# Altium PCB TFT50V30机械图.PcbDoc
Units mil, origin at the board's own origin, x right, y up, seen from the top; angles counter-clockwise.
Board outline 5177.46 x 2992.26 mil, 2 copper layers (Top Layer, Bottom Layer); 2 components, 86 nets, 82 pads, 13 vias.
Unrouted connection lines stored in the file: 53.
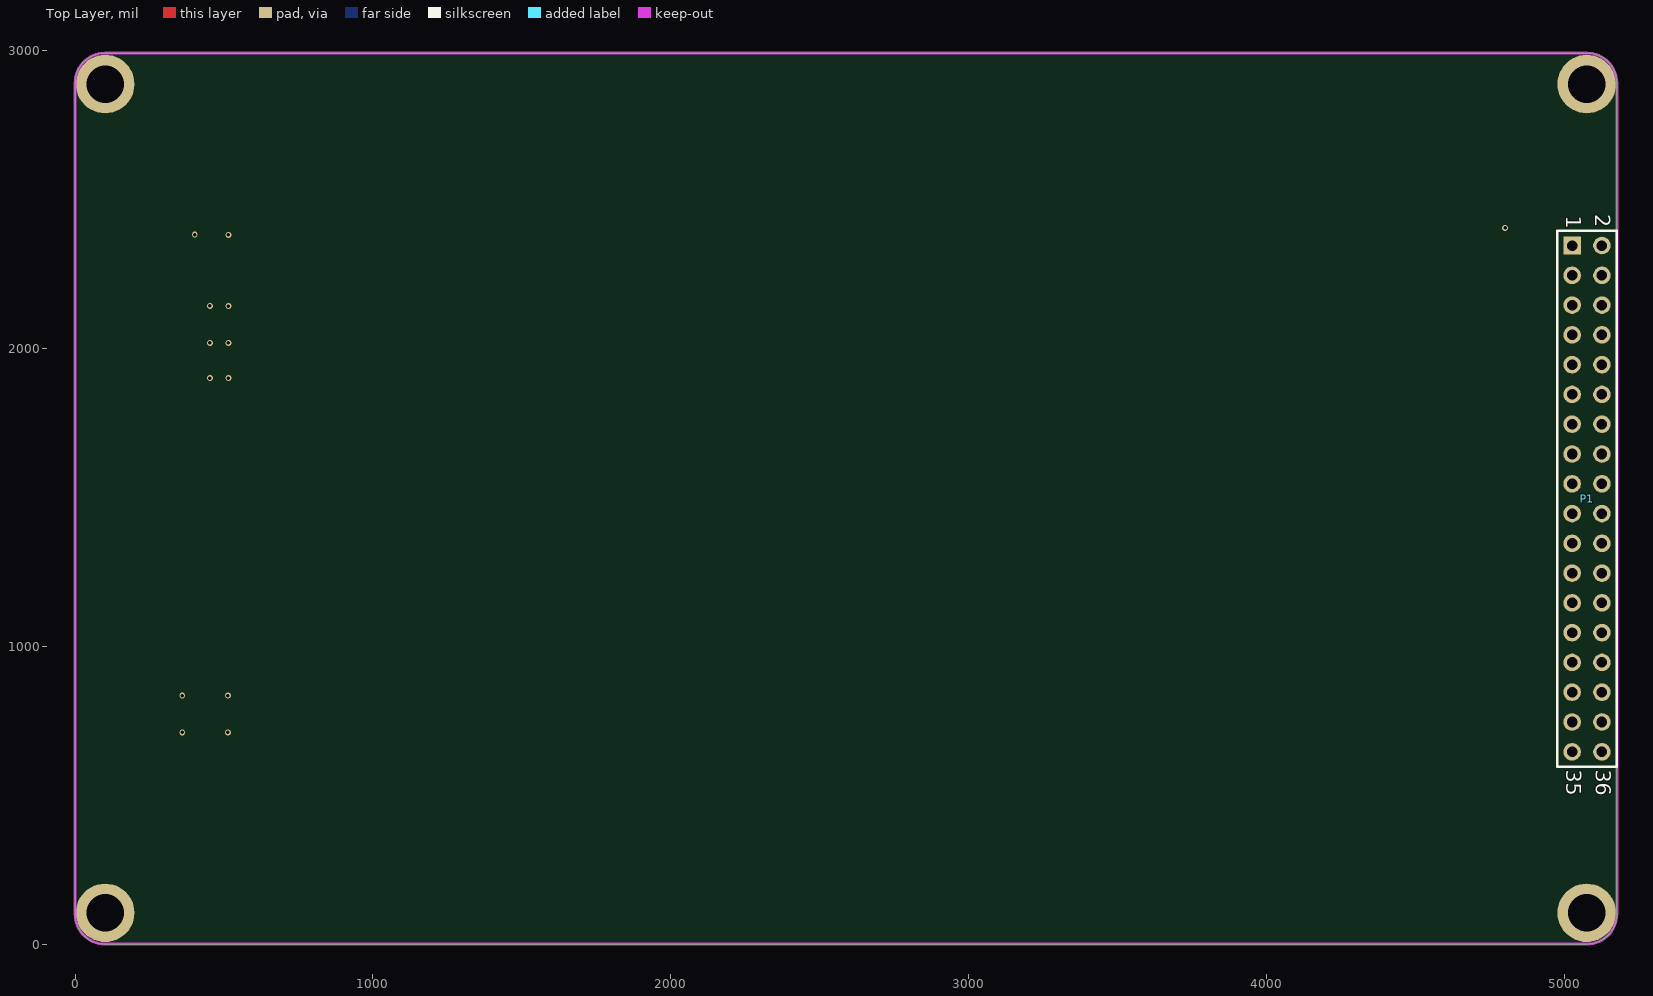
[diagram p0: Top Layer view]
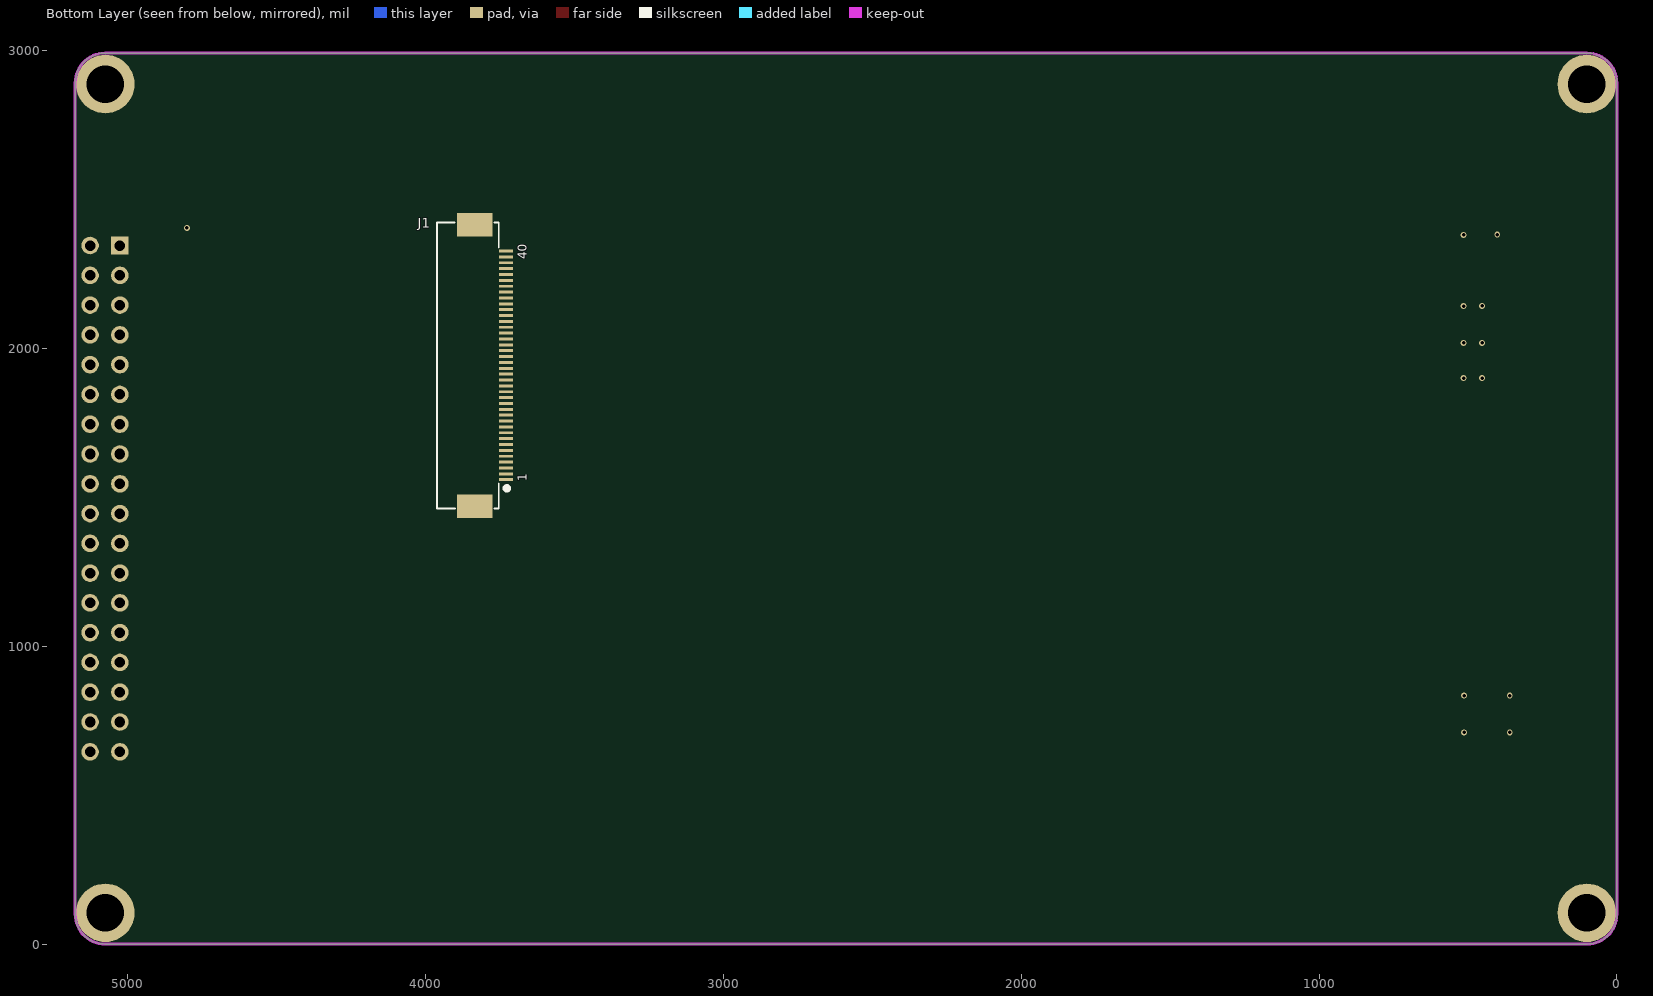
[diagram p1: Bottom Layer view, seen from below]

## Layer stack, top to bottom
Top Solder: solder mask 0.4, Solder Resist, Dk 3.5
Top Layer: signal copper 1.4
Dielectric 1: dielectric 12.6, FR-4, Dk 4.8
Bottom Layer: signal copper 1.4
Bottom Solder: solder mask 0.4, Solder Resist, Dk 3.5

## Board outline
0.34,101 0.34,2893 0,2893 cw(c100,2893) 100,2993 100,2992.87 5077.07,2992.87 5077.07,2993 cw(c5077.07,2893.07) 5177,2893.07 5177.46,2893.07 5177.46,101 5177,101 cw(c5077,101) 5077,1 5077,0.74 100,0.74 100,1 cw(c100,101)

## Design rules (kind name [scope] priority, off if disabled: settings)
Clearance [All] p1: gap=7.87
ComponentClearance [All] p1 off: gap=10 collisioncheckmode=3 verticalgap=10 showdistances=FALSE
Height [All] p1 off: minheight=0 maxheight=1000 prefheight=500
LayerPairs [All] p1 off: enforce=TRUE
MinimumSolderMaskSliver [All] p1 off: minsoldermaskwidth=10
NetAntennae [All] p1 off: netantennaetolerance=0
PolygonConnect PolygonConnect_1 [All vs IsVia] p1: connectstyle=Direct reliefconductorwidth=10 reliefentries=4 polygonreliefangle="90 Angle" airgapwidth=10
PolygonConnect [All] p2: connectstyle=Direct reliefconductorwidth=10 reliefentries=4 polygonreliefangle="90 Angle" airgapwidth=10
RoutingVias [All] p1: holewidth=15.75 width=25.59 viastyle="Through Hole" minholewidth=11.81 minwidth=19.68 maxholewidth=23.62 maxwidth=39.37
SilkToSilkClearance [All] p1 off: silktosilkclearance=10
SilkToSolderMaskClearance [IsPad] p1 off: minsilkscreentomaskgap=10 clearancetoexposedcopper=TRUE
SolderMaskExpansion [All] p1: expansion=2
Width [All] p1: maxlimit=39.37 minlimit=7.87 preferedwidth=7.87
23 further rules are at their usual default settings.

## Components (designator, comment, footprint, x,y, rotation, side; value= is the part's Value field where it differs from the comment)
J1 "FPC_40" FPC-TOP40 3726.83,1560.5 r90 bottom locked
P1 "Header 18X2" HDR2X18 5027.15,2346.77 r270 top

## Footprints (in the part's own frame and the unit in brackets; to place one, negate y for a bottom-side part, rotate by r counter-clockwise, add the part's x,y. Pads: shape width x height; smd on the part's side, far side on the other; paste and mask are expansions set on the pad)
FPC-TOP40 [mm]
  rect 0.25x1.2 smd: 1(0,0.102) 2(0.5,0.102) 3(1,0.102) 4(1.5,0.102) 5(2,0.102) 6(2.5,0.102) 7(3,0.102) 8(3.5,0.102) 9(4,0.102) 10(4.5,0.102) 11(5,0.102) 12(5.5,0.102) 13(6,0.102) 14(6.5,0.102) 15(7,0.102) 16(7.5,0.102) 17(8,0.102) 18(8.5,0.102) 19(9,0.102) 20(9.5,0.102) 21(10,0.102) 22(10.5,0.102) 23(11,0.102) 24(11.5,0.102) 25(12,0.102) 26(12.5,0.102) 27(13,0.102) 28(13.5,0.102) 29(14,0.102) 30(14.5,0.102) 31(15,0.102) 32(15.5,0.102) 33(16,0.102) 34(16.5,0.102) 35(17,0.102) 36(17.5,0.102) 37(18,0.102) 38(18.5,0.102) 39(19,0.102) 40(19.5,0.102)
  rect 2x3 smd: 41(-2.25,2.754) 42(21.725,2.754)
  silkscreen extent -2.45,-0.15 21.92,5.97
HDR2X18 [mm] "Connector; Header; 18x2 Position"
  rect 1.5x1.5 hole 0.9: 1(0,0)
  round 1.5 hole 0.9: 2(0,2.54) 3(2.54,0) 4(2.54,2.54) 5(5.08,0) 6(5.08,2.54) 7(7.62,0) 8(7.62,2.54) 9(10.16,0) 10(10.16,2.54) 11(12.7,0) 12(12.7,2.54) 13(15.24,0) 14(15.24,2.54) 15(17.78,0) 16(17.78,2.54) 17(20.32,0) 18(20.32,2.54) 19(22.86,0) 20(22.86,2.54) 21(25.4,0) 22(25.4,2.54) 23(27.94,0) 24(27.94,2.54) 25(30.48,0) 26(30.48,2.54) 27(33.02,0) 28(33.02,2.54) 29(35.56,0) 30(35.56,2.54) 31(38.1,0) 32(38.1,2.54) 33(40.64,0) 34(40.64,2.54) 35(43.18,0) 36(43.18,2.54)
  silkscreen extent -1.27,-1.27 44.45,3.81

## Part data
J1: library part h_40
P1: "Header, 18-Pin, Dual row"

## Free pads (board coordinates)
  round 196.85 hole 125.98: 2(101,106) 3(101,2889) 4(5076,2889) 5(5076,106)

## Via types
v1: diameter 19.68, hole 11.81, Top Layer to Bottom Layer, tented both sides, 13 vias

## Nets (pads, with @x,y where several pads share a name; then routed paths per layer and width w, separated by ;. In a path a pad name is that pad's centre, name@x,y a point inside that pad or via, vN(x,y) a via of type N, cw(c..) or ccw(c..) an arc to the next point about the centre after c; other vN are vias at no path point)
BL_GND: 
BL_VCC: 
CT_INT: 
CT_RST: 
CT_SCL: 
CT_SDA: 
EARTH: 
GND: J1.11 J1.20 J1.29 J1.41 J1.42 P1.24 P1.28 P1.29 pad.2 pad.3 pad.4 pad.5
  other v1: 360,711.67 513,711.67 360,835.67 513,835.67 453,1901.67 515,1901.67 453,2020 515,2019.67 453,2144 515,2143.67 515,2382.67 402,2383.67 4802,2406
LCD_B0: J1.21
LCD_B1: J1.22
LCD_B2: J1.23
LCD_B3: J1.24 P1.17
LCD_B4: J1.25 P1.18
LCD_B5: J1.26 P1.15
LCD_B6: J1.27 P1.16
LCD_B7: J1.28 P1.13
LCD_BL: J1.34 P1.10
LCD_CLK: J1.30 P1.14
LCD_DE: J1.33 P1.9
LCD_G0: J1.12
LCD_G1: J1.13
LCD_G2: J1.14 P1.25
LCD_G3: J1.15 P1.23
LCD_G4: J1.16 P1.21
LCD_G5: J1.17 P1.22
LCD_G6: J1.18 P1.19
LCD_G7: J1.19 P1.20
LCD_HSYNC: J1.31 P1.11
LCD_R0: J1.3
LCD_R1: J1.4
LCD_R2: J1.5
LCD_R3: J1.6 P1.35
LCD_R4: J1.7 P1.33
LCD_R5: J1.8 P1.34
LCD_R6: J1.9 P1.31
LCD_R7: J1.10 P1.32
LCD_VSYNC: J1.32 P1.12
NetC8_1: 
NetC11_1: 
NetD1_1: 
NetR4_1: 
NetR5_2: 
RESET: J1.40 P1.4
RT_CLK: 
RT_CS: 
RT_MOSI: 
RT_PEN: 
TFT_B0: 
TFT_B1: 
TFT_B2: 
TFT_B3: 
TFT_B4: 
TFT_B5: 
TFT_B6: 
TFT_B7: 
TFT_CLK: 
TFT_DE: 
TFT_G0: 
TFT_G1: 
TFT_G2: 
TFT_G3: 
TFT_G4: 
TFT_G5: 
TFT_G6: 
TFT_G7: 
TFT_HS: 
TFT_R0: 
TFT_R1: 
TFT_R2: 
TFT_R3: 
TFT_R4: 
TFT_R5: 
TFT_R6: 
TFT_R7: 
TFT_VS: 
TP_CS: J1.35 P1.7
TP_MISO: J1.37 P1.5
TP_MOSI: J1.36 P1.8
TP_PEN: J1.39 P1.3
TP_SCK: J1.38 P1.6
VCC5.0: J1.1 J1.2 P1.30
VDD3.3: 
X+: 
X-: 
Y+: 
Y-: 
pads on no net: P1.1 P1.2 P1.26 P1.27 P1.36

## Keep-outs
Keep-Out Layer:
  lines w10: 0,101 ccw(c100,101) 100,1 ; 0,2893 cw(c100,2893) 100,2993 ; 0.34,101 0.34,173.67 0.34,2623.67 0.34,2893 ; 100,0.74 5077,0.74 ; 100,2992.87 5077.07,2992.87 ; 5077,1 ccw(c5077,101) 5177,101 ; 5077.07,2993 cw(c5077.07,2893.07) 5177,2893.07 ; 5177.46,101 5177.46,2623.67 5177.46,2893.07

## Silkscreen, mask and mechanical layers (free items; w line width, h text height)
Bottom Solder:
  text "触摸显示屏" at 273,2159 h300 r90
  text "TFT5.0''_V3.0" at 452,1874.67 h200 r90

## Dimensions
5027.15,2346.77 to 5177.46,2623.67 on Top Overlay
5076,2889 to 5177.46,2893.07 on Top Overlay
5076,2889 to 5127.15,2346.77 on Top Overlay
5076,2889 to 5076,106 on Top Overlay
101,2889 to 5076,2889 on Top Overlay

## Text inside footprints (layer, text, board x,y; h text height)
J1: Bottom Overlay "1" at 3660.25,1554.91 h30 r270; Bottom Overlay "40" at 3660.83,2300.5 h30 r270
P1: Top Overlay "2" at 5104,2451.1 h50 r270; Top Overlay "1" at 5007.15,2446.77 h50 r270; Top Overlay "35" at 5007.15,586.77 h50 r270; Top Overlay "36" at 5107.15,586.77 h50 r270